# Altium PCB PiDP11IOExpander.PcbDoc
Units mil, origin at the board's own origin, x right, y up, seen from the top; angles counter-clockwise.
Board outline 2350 x 850 mil, 2 copper layers (Top Layer, Bottom Layer), stack 62.992 mil thick; 23 components, 30 nets, 100 pads, 59 vias.
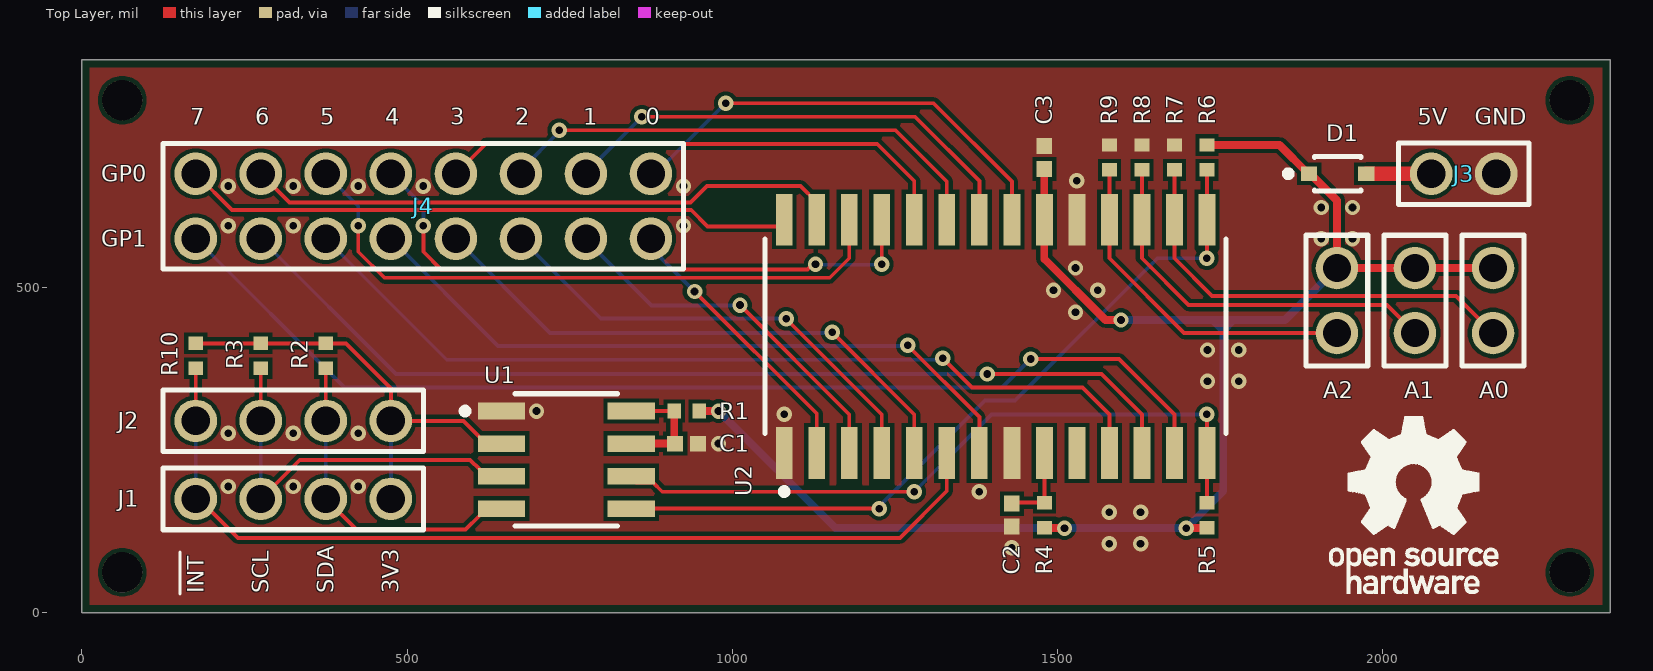
[diagram p0: Top Layer view]
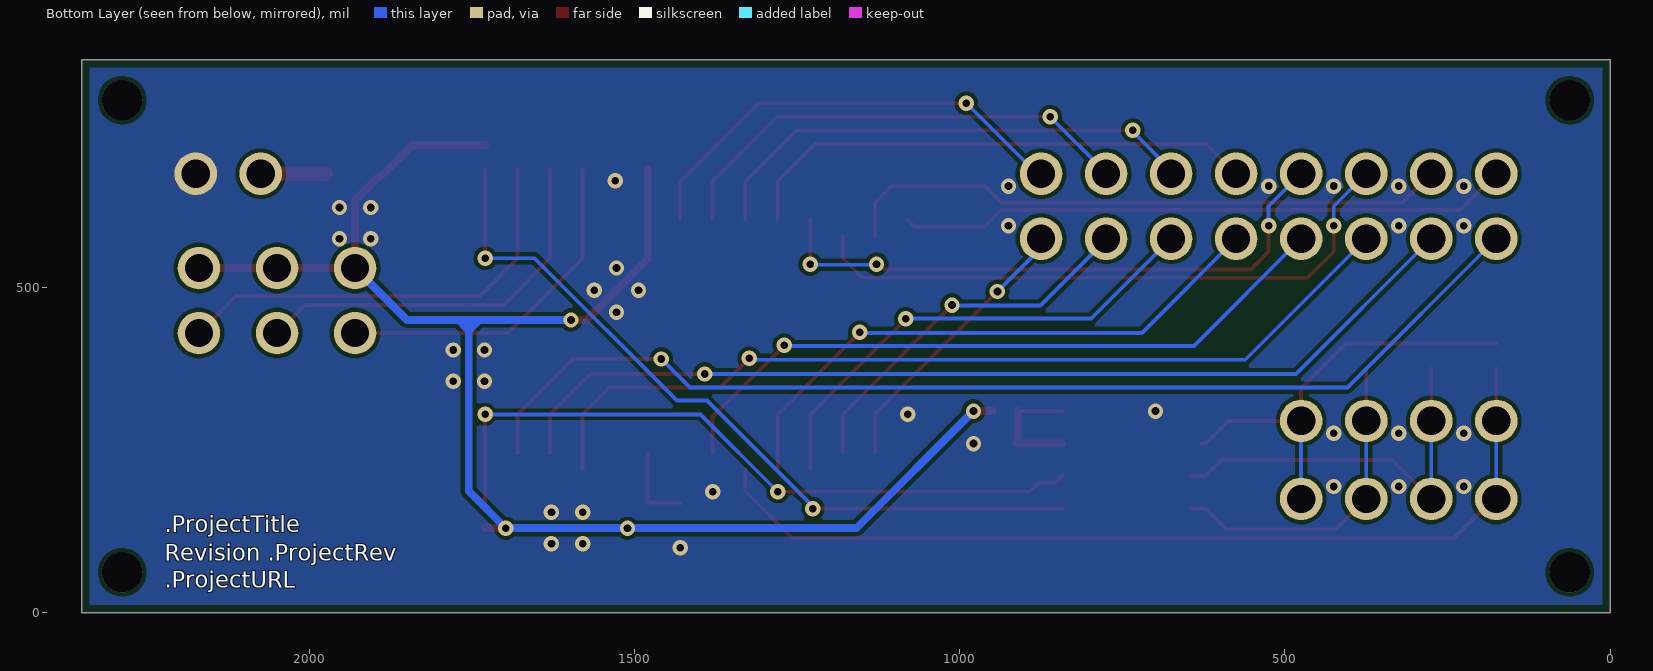
[diagram p1: Bottom Layer view, seen from below]
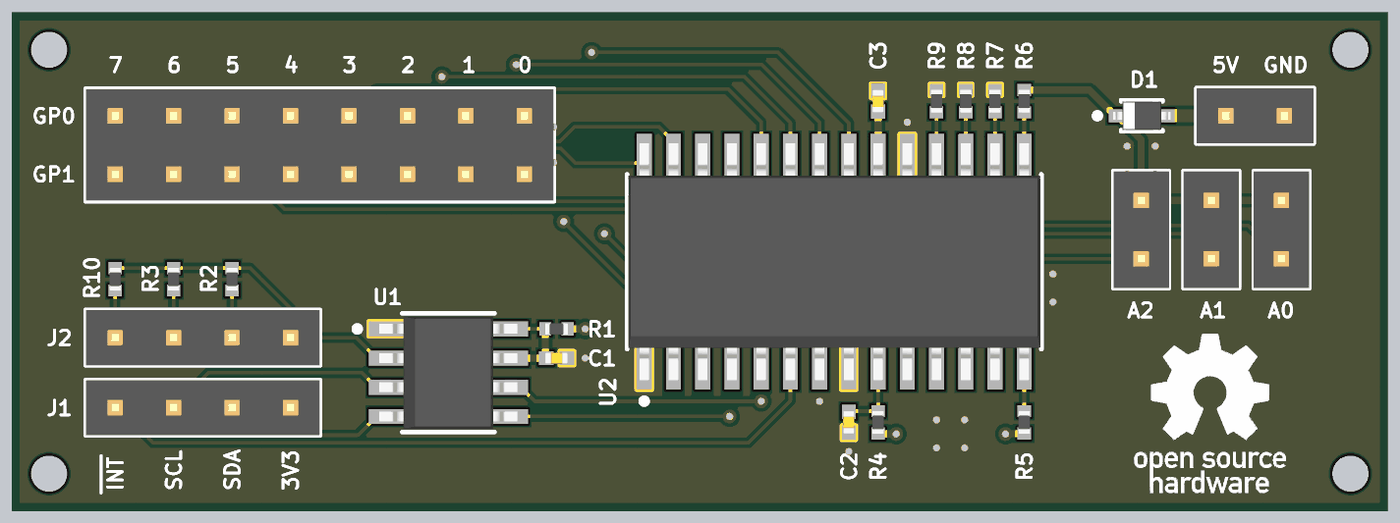
[diagram p2: 3D render of the assembled board from above, using the file's embedded part models]

## Layer stack, top to bottom
Top Solder: solder mask 0.3937, Solder Resist, Dk 3.5
Top Layer: signal copper 1.378
Dielectric: dielectric 60.2362, FR-4 TG130, Dk 4.2
Bottom Layer: signal copper 1.378
Bottom Solder: solder mask 0.3937, Solder Resist, Dk 3.5

## Board outline
0,0 2350,0 2350,850 0,850

## Design rules (kind name [scope] priority, off if disabled: settings)
BoardOutlineClearance [All] p1: gap=11.81 ignorepadtopadclearanceinfootprint=FALSE
Clearance [All] p1: gap=6 ignorepadtopadclearanceinfootprint=FALSE
ComponentClearance [All] p1: gap=6 collisioncheckmode=3 verticalgap=100000 showdistances=FALSE
DiffPairsRouting [All] p1: maxlimit=60 minlimit=30 mostfreqgap=40 toplayer_minwidth=6 toplayer_maxwidth=12 toplayer_prefwidth=8 bottomlayer_minwidth=6 bottomlayer_maxwidth=12 bottomlayer_prefwidth=8 maxuncoupledlength=500
HoleSize HoleSize_NPTH [(HoleDiameter > 0) And (PadIsPlated = 'False')] p1: absolutevalues=TRUE maxlimit=248.03 minlimit=7.87 maxpercent=80.000 minpercent=20.000
HoleSize HoleSize_PTH [(HoleDiameter > 0) And (PadIsPlated = 'True')] p2: absolutevalues=TRUE maxlimit=228.35 minlimit=7.87 maxpercent=80.000 minpercent=20.000
HoleToHoleClearance [All] p1: gap=12 allowstackedmicrovias=FALSE
MinimumAnnularRing [NOT IsVia] p1: minimumring=6
MinimumAnnularRing MinimumAnnularRing_Via [IsVia] p2: minimumring=3.94
MinimumSolderMaskSliver [All] p1: minsoldermaskwidth=15.75
PlaneClearance [All] p1: clearance=7.87
PlaneConnect [All] p1: planeconnectstyle=Direct reliefexpansion=20 reliefentries=4 reliefconductorwidth=10 reliefairgap=10
PolygonConnect [All] p1: connectstyle=Direct reliefconductorwidth=10 reliefentries=4 polygonreliefangle="90 Angle" airgapwidth=10
RoutingVias [All] p1: holewidth=11.81 width=23.62 viastyle="Through Hole" minholewidth=7.87 minwidth=15.75 maxholewidth=19.68 maxwidth=39.37
SilkToSilkClearance [All] p1: silktosilkclearance=6
SilkToSolderMaskClearance [IsPad] p1: minsilkscreentomaskgap=6 clearancetoexposedcopper=TRUE
SolderMaskExpansion SolderMaskExpansion_Via [IsVia] p1: expansion=4 istentingtop=TRUE
SolderMaskExpansion [All] p2: expansion=3.94 istentingtop=FALSE
UnRoutedNet [All] p1: checkbadconnections=TRUE
Width Width_1A [InNetClass('1A')] p1: maxlimit=100 minlimit=12 preferedwidth=12
Width [All] p2: maxlimit=100 minlimit=6 preferedwidth=6
20 further rules are at their usual default settings.

## Classes and differential pairs
net class 1A: VCC_5V

## Components (designator, comment, footprint, x,y, rotation, side; value= is the part's Value field where it differs from the comment)
A0 "10129378-902001BLF" AMPH-10129378-902001BLF 2170,530 r270 top locked
A1 "10129378-902001BLF" AMPH-10129378-902001BLF 2050,530 r270 top locked
A2 "10129378-902001BLF" AMPH-10129378-902001BLF 1930,530 r270 top locked
C1 "0.1uF" AVX-CC0402 930,260 r180 top locked
C2 "33pF" AVX-CC0402 1430,150 r270 top locked
C3 "0.1uF" AVX-CC0402 1480,700 r270 top locked
D1 "NSVR0320MW2T1G" ONSC-NSVR0320MW2T1G 1931.1,675 r0 top locked
J1 "10129378-904001BLF" AMPH-10129378-904001BLF 475,175 r180 top locked
J2 "10129378-904001BLF" AMPH-10129378-904001BLF 475,295 r180 top locked
J3 "10129378-902001BLF" AMPH-10129378-902001BLF 2075,675 r0 top locked
J4 "10129381-916001BLF" AMPH-10129381-916001BLF 875,675 r180 top locked
R1 "200K" VBEY-CR0402 930,310 r0 top locked
R2 "1.8K" VBEY-CR0402 375,395 r90 top locked
R3 "1.8K" VBEY-CR0402 275,395 r90 top locked
R4 "3.9K" VBEY-CR0402 1480,150 r270 top locked
R5 "2.2K" VBEY-CR0402 1730,150 r270 top locked
R6 "2.2K" VBEY-CR0402 1730,700 r90 top locked
R7 "10K" VBEY-CR0402 1680,700 r270 top locked
R8 "10K" VBEY-CR0402 1630,700 r270 top locked
R9 "10K" VBEY-CR0402 1580,700 r270 top locked
R10 "1.8K" VBEY-CR0402 175,395 r90 top locked
U1 "PCA9306D" NXP-PCA9306D 745,235 r0 top locked
U2 "MCP23016-I/SO" MCHP-SOIC-28 1405,425 r90 top locked

## Footprints (in the part's own frame and the unit in brackets; to place one, negate y for a bottom-side part, rotate by r counter-clockwise, add the part's x,y. Pads: shape width x height; smd on the part's side, far side on the other; paste and mask are expansions set on the pad)
AMPH-10129378-902001BLF [mm] "Header, Vertical Non-Shrouded, 2.54 mm pitch; 0.67 mm lead width, 2 pins, 1 row, 2 pins per row, 5.08 mm L X 2.41 mm W X 8.58 mm H body"
  round 1.66 hole 1.1 paste-1.66: 1(0,0) 2(2.54,0)
  silkscreen extent -1.28,-1.2 3.82,1.2, body extent -1.27,-1.2 3.81,1.2, height 8.58
AMPH-10129378-904001BLF [mm] "Header, Vertical Non-Shrouded, 2.54 mm pitch; 0.67 mm lead width, 4 pins, 1 row, 4 pins per row, 10.16 mm L X 2.41 mm W X 8.58 mm H body"
  round 1.66 hole 1.1 paste-1.66: 1(0,0) 2(2.54,0) 3(5.08,0) 4(7.62,0)
  silkscreen extent -1.28,-1.2 8.9,1.2, body extent -1.27,-1.2 8.89,1.2, height 8.58
AMPH-10129381-916001BLF [mm] "Header, Vertical Non-Shrouded, 2.54 mm pitch; 0.67 mm lead width, 16 pins, 2 rows, 8 pins per row, 20.32 mm L X 4.83 mm W X 8.58 mm H body"
  round 1.66 hole 1.1 paste-1.66: 1(0,0) 2(0,2.54) 3(2.54,0) 4(2.54,2.54) 5(5.08,0) 6(5.08,2.54) 7(7.62,0) 8(7.62,2.54) 9(10.16,0) 10(10.16,2.54) 11(12.7,0) 12(12.7,2.54) 13(15.24,0) 14(15.24,2.54) 15(17.78,0) 16(17.78,2.54)
  silkscreen extent -1.28,-1.18 19.06,3.72, body extent -1.27,-1.14 19.05,3.68, height 8.58
AVX-CC0402 [mm] "Capacitor, Chip; 1.00 mm L X 0.50 mm W X 0.60 mm H body"
  rect 0.628x0.609 smd: 1(-0.45,0) 2(0.45,0)
  body extent -0.5,-0.25 0.5,0.25, height 0.6
MCHP-SOIC-28 [mil] "Small Outline IC (SOIC), 1.27 mm pitch; 28 pin, 17.90 mm L X 7.50 mm W X 2.65 mm H body"
  rect 79.29x25.94 smd: 1(-179.45,325) 2(-179.45,275) 3(-179.45,225) 4(-179.45,175) 5(-179.45,125) 6(-179.45,75) 7(-179.45,25) 8(-179.45,-25) 9(-179.45,-75) 10(-179.45,-125) 11(-179.45,-175) 12(-179.45,-225) 13(-179.45,-275) 14(-179.45,-325) 15(179.45,-325) 16(179.45,-275) 17(179.45,-225) 18(179.45,-175) 19(179.45,-125) 20(179.45,-75) 21(179.45,-25) 22(179.45,25) 23(179.45,75) 24(179.45,125) 25(179.45,175) 26(179.45,225) 27(179.45,275) 28(179.45,325)
  silkscreen extent -244,-354 150,354, body extent -203,-352 203,352, height 104
NXP-PCA9306D [mm] "Small Outline IC (SOIC), 1.27 mm pitch; 8 pin, 4.90 mm L X 3.90 mm W X 1.75 mm H body"
  rect 1.846x0.651 smd: 1(-2.535,1.905) 2(-2.535,0.635) 3(-2.535,-0.635) 4(-2.535,-1.905) 5(2.535,-1.905) 6(2.535,-0.635) 7(2.535,0.635) 8(2.535,1.905)
  silkscreen extent -4.08,-2.58 2,2.58, body extent -3,-2.45 3,2.45, height 1.75
ONSC-NSVR0320MW2T1G [mm] "Diode, Small Outline Diode (SOD); 1.70 mm L X 1.25 mm W X 1.00 mm H body"
  rect 0.63x0.557 smd: A(1.115,0) C(-1.115,0)
  silkscreen extent -2.05,-0.67 0.9,0.67, body extent -1.25,-0.63 1.25,0.63, height 1
VBEY-CR0402 [mm] "Resistor, Chip; 1.00 mm L X 0.50 mm W X 0.55 mm H body"
  rect 0.525x0.58 smd: 1(-0.487,0) 2(0.487,0)
  body extent -0.5,-0.25 0.5,0.25, height 0.55

## Part data
A0 A1 A2 J3: "CONN HEADER VERT 2POS 2.54MM", Manufacturer="Amphenol ICC", Supplier Part Number 1=10129378-902001BLF-ND, ComponentLink1Description=Datasheet, ComponentLink1URL=https://cdn.amphenol-icc.com/media/wysiwyg/files/drawing/10129378.pdf, ComponentLink2Description="Manufacturer URL", ComponentLink2URL=https://www.amphenol-icc.com/product-series/econostik-254mm.html, Manufacturer Part Number=10129378-902001BLF, Number of Positions=2, Number of Rows=1, Pitch=2.54mm, Supplier 1=Digi-Key, Supplier 2=Mouser, Supplier Part Number 2=649-1012937890201BLF
C1 C3: library part 04023C104KAT2A, "CAP CER 0.1UF 25V X7R 0402", Case Code=0402, Manufacturer=AVX, Supplier Part Number 1=478-7868-1-ND, Tolerance=10%, Voltage Rating=25V, ComponentLink1Description=Datasheet, ComponentLink1URL=https://catalogs.avx.com/SurfaceMount.pdf, ComponentLink2Description="Manufacturer URL", ComponentLink2URL=https://www.avx.com/products/ceramic-capacitors/surface-mount/x7r-dielectric/, Manufacturer Part Number=04023C104KAT2A, Supplier 1=Digi-Key, Supplier 2=Mouser, Supplier Part Number 2=581-04023C104KAT2A
C2: library part 04023A330JAT2A, "CAP CER 33PF 25V C0G/NP0 0402", Case Code=0402, Manufacturer=AVX, Supplier Part Number 1=478-12613-1-ND, Tolerance=5%, Voltage Rating=25V, ComponentLink1Description=Datasheet, ComponentLink1URL=https://catalogs.avx.com/SurfaceMount.pdf, ComponentLink2Description="Manufacturer URL", ComponentLink2URL=https://www.avx.com/products/ceramic-capacitors/surface-mount/c0g-np0-dielectric/, Manufacturer Part Number=04023A330JAT2A, Supplier 1=Digi-Key, Supplier 2=Mouser, Supplier Part Number 2=581-04023A330JAT2A
D1: "DIODE SCHOTTKY 20V 1A SOD323", Case Code=SOD-323, Forward Current=1A, Forward Voltage=500mV, Manufacturer="ON Semiconductor", Reverse Voltage=20V, Supplier Part Number 1=NSVR0320MW2T1GOSCT-ND, ComponentLink1Description=Datasheet, ComponentLink1URL=https://www.onsemi.com/pdf/datasheet/nsr0320mw2t1-d.pdf, ComponentLink2Description="Manufacturer URL", ComponentLink2URL=https://www.onsemi.com/products/discretes-drivers/diodes-rectifiers/schottky-diodes-schottky-rectifiers/nsr0320, Manufacturer Part Number=NSVR0320MW2T1G, Reverse Leakage=1mA, Supplier 1=Digi-Key, Supplier 2=Mouser, Supplier Part Number 2=863-NSVR0320MW2T1G
J1 J2: "CONN HEADER VERT 4POS 2.54MM", Manufacturer="Amphenol ICC", Supplier Part Number 1=10129378-904001BLF-ND, ComponentLink1Description=Datasheet, ComponentLink1URL=https://cdn.amphenol-icc.com/media/wysiwyg/files/drawing/10129378.pdf, ComponentLink2Description="Manufacturer URL", ComponentLink2URL=https://www.amphenol-icc.com/product-series/econostik-254mm.html, Manufacturer Part Number=10129378-904001BLF, Number of Positions=4, Number of Rows=1, Pitch=2.54mm, Supplier 1=Digi-Key, Supplier 2=Mouser, Supplier Part Number 2=649-1012937890401BLF
J4: "CONN HEADER VERT 16POS 2.54MM", Manufacturer="Amphenol ICC", Supplier Part Number 1=10129381-916001BLF-ND, ComponentLink1Description="Manufacturer URL", ComponentLink1URL=https://www.amphenol-icc.com/product-series/econostik-254mm.html, ComponentLink2Description=Datasheet, ComponentLink2URL=https://cdn.amphenol-icc.com/media/wysiwyg/files/drawing/10129381.pdf, Manufacturer Part Number=10129381-916001BLF, Number of Positions=8, Number of Rows=2, Pitch=2.54mm, Supplier 1=Digi-Key, Supplier 2=Mouser, Supplier Part Number 2=649-1012938191601BLF
R1: library part MCS04020C2003FE000, "RES SMD 200K OHM 1% 1/10W 0402", Case Code=0402, Manufacturer="Vishay Beyschlag", Power=1/10W, Supplier Part Number 1=749-1562-1-ND, Tolerance=1%, ComponentLink1Description=Datasheet, ComponentLink1URL=https://www.vishay.com/docs/28705/mcx0x0xpro.pdf, ComponentLink2Description="Manufacturer URL", ComponentLink2URL=https://www.vishay.com/product?docid=28705, Manufacturer Part Number=MCS04020C2003FE000, Supplier 1=Digi-Key, Supplier 2=Mouser, Supplier Part Number 2=594-MCS04020C2003FE0
R2 R3 R10: library part MCS04020C1801FE000, "RES SMD 1.8K OHM 1% 1/10W 0402", Case Code=0402, Manufacturer="Vishay Beyschlag", Power=1/10W, Supplier Part Number 1=749-1558-1-ND, Tolerance=1%, ComponentLink1Description=Datasheet, ComponentLink1URL=https://www.vishay.com/docs/28705/mcx0x0xpro.pdf, ComponentLink2Description="Manufacturer URL", ComponentLink2URL=https://www.vishay.com/product?docid=28705, Manufacturer Part Number=MCS04020C1801FE000, Supplier 1=Digi-Key, Supplier 2=Mouser, Supplier Part Number 2=594-MCS04020C1801FE0
R4: library part MCS04020C3901FE000, "RES SMD 3.9K OHM 1% 1/10W 0402", Case Code=0402, Manufacturer="Vishay Beyschlag", Power=1/10W, Supplier Part Number 1=749-1578-1-ND, Tolerance=1%, ComponentLink1Description=Datasheet, ComponentLink1URL=https://www.vishay.com/docs/28705/mcx0x0xpro.pdf, ComponentLink2Description="Manufacturer URL", ComponentLink2URL=https://www.vishay.com/product?docid=28705, Manufacturer Part Number=MCS04020C3901FE000, Supplier 1=Digi-Key, Supplier 2=Mouser, Supplier Part Number 2=594-MCS04020C3901FE0
R5 R6: library part MCS04020C2201FE000, "RES SMD 2.2K OHM 1% 1/10W 0402", Case Code=0402, Manufacturer="Vishay Beyschlag", Power=1/10W, Supplier Part Number 1=749-1564-1-ND, Tolerance=1%, ComponentLink1Description=Datasheet, ComponentLink1URL=https://www.vishay.com/docs/28705/mcx0x0xpro.pdf, ComponentLink2Description="Manufacturer URL", ComponentLink2URL=https://www.vishay.com/product?docid=28705, Manufacturer Part Number=MCS04020C2201FE000, Supplier 1=Digi-Key, Supplier 2=Mouser, Supplier Part Number 2=594-MCS04020C2201FE0
R7 R8 R9: library part MCS0402MC1002FE000, "RES SMD 10K OHM 1% 1/10W 0402", Case Code=0402, Manufacturer="Vishay Beyschlag", Power=1/10W, Supplier Part Number 1=MCS0402-10.0K-MFCT-ND, Tolerance=1%, ComponentLink1Description=Datasheet, ComponentLink1URL=https://www.vishay.com/docs/28705/mcx0x0xpro.pdf, ComponentLink2Description="Manufacturer URL", ComponentLink2URL=https://www.vishay.com/product?docid=28705, Manufacturer Part Number=MCS0402MC1002FE000, Supplier 1=Digi-Key, Supplier 2=Mouser, Supplier Part Number 2=594-MCS0402MC1002FE0
U1: "IC TRNSLTR BIDIRECTIONAL 8SO", Case Code=SO-8, Manufacturer=NXP, Supplier Part Number 1=568-4214-1-ND, ComponentLink1Description=Datasheet, ComponentLink1URL=https://www.nxp.com/docs/en/data-sheet/PCA9306.pdf, ComponentLink2Description="Manufacturer URL", ComponentLink2URL=https://www.nxp.com/products/interfaces/ic-spi-serial-interface-devices/ic-voltage-level-translators/dual-bidirectional-i2c-bus-and-smbus-voltage-level-translator:PCA9306, Manufacturer Part Number=PCA9306D, Supplier 1=Digi-Key, Supplier 2=Mouser, Supplier Part Number 2=771-PCA9306DP-T
U2: "IC I/O EXPANDER I2C 16B 28SOIC", Case Code=SOIC-28, Manufacturer=Microchip, Supplier Part Number 1=MCP23016-I/SO-ND, ComponentLink1Description=Datasheet, ComponentLink1URL=https://ww1.microchip.com/downloads/en/DeviceDoc/20090C.pdf, ComponentLink2Description="Manufacturer URL", ComponentLink2URL=https://www.microchip.com/wwwproducts/en/MCP23016, Manufacturer Part Number=MCP23016-I/SO, Supplier 1=Digi-Key, Supplier 2=Mouser, Supplier Part Number 2=579-MCP23016-I/SO

## Free pads (board coordinates)
  round 62 hole 62 unplated: ""(62,62) ""(62,788) ""(2288,62) ""(2288,788)

## Via types
v1: diameter 23.62, hole 11.81, Top Layer to Bottom Layer, tented both sides, 59 vias

## Nets (pads, with @x,y where several pads share a name; then routed paths per layer and width w, separated by ;. In a path a pad name is that pad's centre, name@x,y a point inside that pad or via, vN(x,y) a via of type N, cw(c..) or ccw(c..) an arc to the next point about the centre after c; other vN are vias at no path point)
A0: A0.2 R7.2 U2.16 | length 673.5
  Top Layer w6: R7.2 U2.16 1680,545 1738,487 2113,487 A0.2
A1: A1.2 R8.2 U2.17 | length 603.5
  Top Layer w6: R8.2 U2.17 1630,545 1702,473 2007,473 A1.2
A2: A2.2 R9.2 U2.18 | length 533.5
  Top Layer w6: R9.2 U2.18 1580,545 1695,430 A2.2
CLK: C2.1 R4.1 U2.9 | length 127
  Top Layer w6: C2.1 1431.46,169.17 R4.1 U2.9
GND: C1.1 C2.2 C3.1 J3.2 R7.1 R8.1 R9.1 U1.1 U2.1 U2.8 U2.19
  other v1: 1430,100 1580,106.19 1628,106.19 1580,154.25 1628,154.25 1380,186 225,194 325,194 425,194 979,260 225,276 325,276 425,276 1080,305 699,310 1731,356 1779,356 1731,404 1779,404 1528,462 1494,496 1562,496 1528,530 1906,575 1954,575 225,595 325,595 925,595 1906,623 1954,623 225,656 325,656 425,656 525,656 925,656 1530,664
GP0.0: J4.1 U2.21 | length 708.4
  Top Layer w6: v1(990,783.43) 1309.57,783.43 1430,663 U2.21
  Bottom Layer w6: J4.1 881.57,675 v1(990,783.43)
GP0.1: J4.3 U2.22 | length 742.6
  Top Layer w6: v1(861,762.62) 1281.38,762.62 1380,664 U2.22
  Bottom Layer w6: J4.3 775,676.62 v1(861,762.62)
GP0.2: J4.5 U2.23 | length 778.4
  Top Layer w6: v1(734,741.81) 1251.19,741.81 1330,663 U2.23
  Bottom Layer w6: J4.5 675,681 734,740 v1(734,741.81)
GP0.3: J4.7 U2.24 | length 809.7
  Top Layer w6: J4.7 621,721 1223,721 1280,664 U2.24
  Bottom Layer w6: J4.7 J4.7@577.5,675
GP0.4: J4.9 U2.25 | length 931.5
  Top Layer w6: v1@525,594 525,555 552,528 1115.67,528 1123.67,536 v1(1128,536) ; v1@1230,534 U2.25
  Bottom Layer w6: J4.9 525,625 v1(525,595) v1@525,594 ; v1(1128,536) 1129,535 1229,535 v1@1230,534
  other v1: 1230,536
GP0.5: J4.11 U2.26 | length 959.2
  Top Layer w6: v1@425,594 425,555 465,515 1150,515 1180,545 U2.26@1180,579.45
  Bottom Layer w6: J4.11 425,625 v1@425,594
  other v1: 425,595
GP0.6: J4.13 U2.27 | length 945.6
  Top Layer w6: J4.13 319,631 936,631 961,656 1105.12,656 1130,631.12 U2.27 U2.27@1130,579.45
GP0.7: J4.15 U2.28 | length 943.2
  Top Layer w6: J4.15 231,619 937,619 962,594 1070.03,594 1080,603.97 U2.28
GP1.0: J4.2 U2.2 | length 435.1
  Top Layer w6: v1(942.14,493.86) 1130,306 U2.2
  Bottom Layer w6: J4.2 875,561 v1(942.14,493.86)
GP1.1: J4.4 U2.3 | length 578
  Top Layer w6: v1(1012,473) 1180,305 U2.3
  Bottom Layer w6: J4.4 775,573.14 875.95,472.19 1011.19,472.19 v1(1012,473)
GP1.2: J4.6 U2.4 | length 751.3
  Top Layer w6: v1(1083,452) 1230,305 U2.4 U2.4@1230,220.55
  Bottom Layer w6: J4.6 797.81,452.19 1082.81,452.19 v1(1083,452)
GP1.3: J4.8 U2.5 | length 902
  Top Layer w6: v1(1154,431) 1280,305 U2.5 U2.5@1280,220.55
  Bottom Layer w6: J4.8 719.81,430.19 1153.19,430.19 v1(1154,431)
GP1.4: J4.10 U2.7 | length 1074.8
  Top Layer w6: v1(1270,411) 1380,301 U2.7
  Bottom Layer w6: J4.10 640,410 1269,410 v1(1270,411)
GP1.5: J4.12 U2.11 | length 1402.9
  Top Layer w6: v1(1324,391) 1368.81,346.19 1538.81,346.19 1580,305 U2.11@1580,220.55
  Bottom Layer w6: J4.12 561,389 1322,389 v1(1324,391)
GP1.6: J4.14 U2.12 | length 1526.3
  Top Layer w6: v1(1392,367) 1568,367 1630,305 U2.12
  Bottom Layer w6: J4.14 483,367 v1(1392,367)
GP1.7: J4.16 U2.13 | length 1712.6
  Top Layer w6: v1(1459,390) 1595,390 1680,305 U2.13
  Bottom Layer w6: J4.16 403.81,346.19 1415.19,346.19 v1(1459,390)
INT_3V3: J1.4 J2.4 R10.1 U2.6 | length 1439.1
  Top Layer w6: J2.4 R10.1 ; J1.4@180,175 240,115 1258,115 1330,187 U2.6@1330,220.55
  Bottom Layer w6: J1.4 J2.4
NetC1_2: C1.2 R1.1 U1.7 U1.8 | length 187.7
  Top Layer w6: U1.8@842.99,310 R1.1
  Top Layer w12: U1.7@842.99,260 C1.2 910.83,261.46 R1.1
NetD1_A: D1.A J3.1 | length 100
  Top Layer w21.92: D1.A J3.1
SCL_3V3: J1.3 J2.3 R3.1 U1.3 | length 606.3
  Top Layer w6: J1.3 335,235 596.77,235 611.86,219.91 611.86,219.81 621.67,210 U1.3 ; J2.3 R3.1
  Bottom Layer w6: J1.3 J2.3
SCL_5V: R5.1 U1.6 U2.14 | length 1082.1
  Top Layer w6: U1.6@842.99,210 852.81,200.19 878.28,200.19 892.47,186 v1(1280,186) ; R5.1 U2.14 v1(1730,305)
  Bottom Layer w6: v1(1280,186) 1399,305 v1(1730,305)
SDA_3V3: J1.2 J2.2 R2.1 U1.4 | length 503.9
  Top Layer w6: J1.2 422,128 590,128 611.86,149.86 611.86,150.19 621.67,160 U1.4 ; J2.2 R2.1
  Bottom Layer w6: J1.2 J2.2
SDA_5V: R6.1 U1.5 U2.15 | length 1184.1
  Top Layer w6: U1.5@842.99,160 v1(1226,160) ; v1(1730,545) U2.15 R6.1
  Bottom Layer w6: v1(1226,160) 1226,163 1389,326 1435,326 1654,545 v1(1730,545)
VCC_3V3: J1.1 J2.1 R2.2 R3.2 R10.2 U1.2 | length 664.5
  Top Layer w6: R10.2 R3.2 R2.2 405.83,414.17 475,345 J2.1 ; J2.1@480,295 586.67,295 621.67,260 U1.2@628.39,260
  Top Layer w12: J1.1@480,175 J1.1@482.07,177.07
  Bottom Layer w6: J1.1 J2.1
VCC_5V: A0.1 A1.1 A2.1 C3.2 D1.C R1.2 R4.2 R5.2 R6.2 U2.20 | length 2469.1
  Top Layer w12: R1.2 v1(979,310) ; C3.2 U2.20 1480,544 1574,450 v1(1598,450) ; R4.2@1480.83,130 v1(1511,130) ; v1(1698,130) 1698.41,130.41 1729.59,130.41 R5.2 ; R6.2 1841.59,719.17 1885.77,675 D1.C 1892.17,670.04 1893.89,670.04 1930,633.92 A2.1 A1.1 A0.1
  Bottom Layer w12: v1(979,310) 1159,130 v1(1511,130) v1(1698,130) 1755,187 1755,450 ; v1(1598,450) 1755,450 ; A2.1 1850,450 1755,450
pads on no net: U2.10

## Polygon pours and split planes (outlines as drawn)
GND on Bottom Layer "GND_BOTTOM" (solid, remove dead copper, pour order 1): 0,0 2350,0 2350,850 0,850
GND on Top Layer "GND_TOP" (solid, remove dead copper, pour order 0): 0,0 2350,0 2350,850 0,850

## Silkscreen, mask and mechanical layers (free items; w line width, h text height)
Top Overlay:
  drawing of 19 lines, arcs and shapes, not listed
  text "7" at 166.67,750 h25
  text "6" at 266.67,750 h25
  text "5" at 366.67,750 h25
  text "4" at 466.67,750 h25
  text "3" at 566.67,750 h25
  text "2" at 666.67,750 h25
  text "1" at 770.83,750 h25
  text "0" at 866.67,750 h25
  text "5V" at 2054.17,750 h25
  text "GND" at 2141.68,750 h25
  text "GP0" at 30,662.5 h25
  text "GP1" at 30,562.5 h25
  text "INT" at 187.5,30 h25 r90
  text "SCL" at 287.5,30 h25 r90
  text "SDA" at 387.5,30 h25 r90
  text "3V3" at 487.5,30 h25 r90
Bottom Overlay:
  text ".ProjectTitle" at 2223,123.33 h25
  text "Revision .ProjectRev" at 2223,80 h25
  text ".ProjectURL" at 2223,38.33 h25
Board Shape:
  the board outline again, w3.94